# Altium PCB ESP32_EC.PcbDoc (part 1 of 2)
Units mil, origin at the board's own origin, x right, y up, seen from the top; angles counter-clockwise.
Board outline 2362.2 x 3110.24 mil, 2 copper layers (Top Layer, Bottom Layer), stack 61.756 mil thick; 57 components, 42 nets, 194 pads, 226 vias.
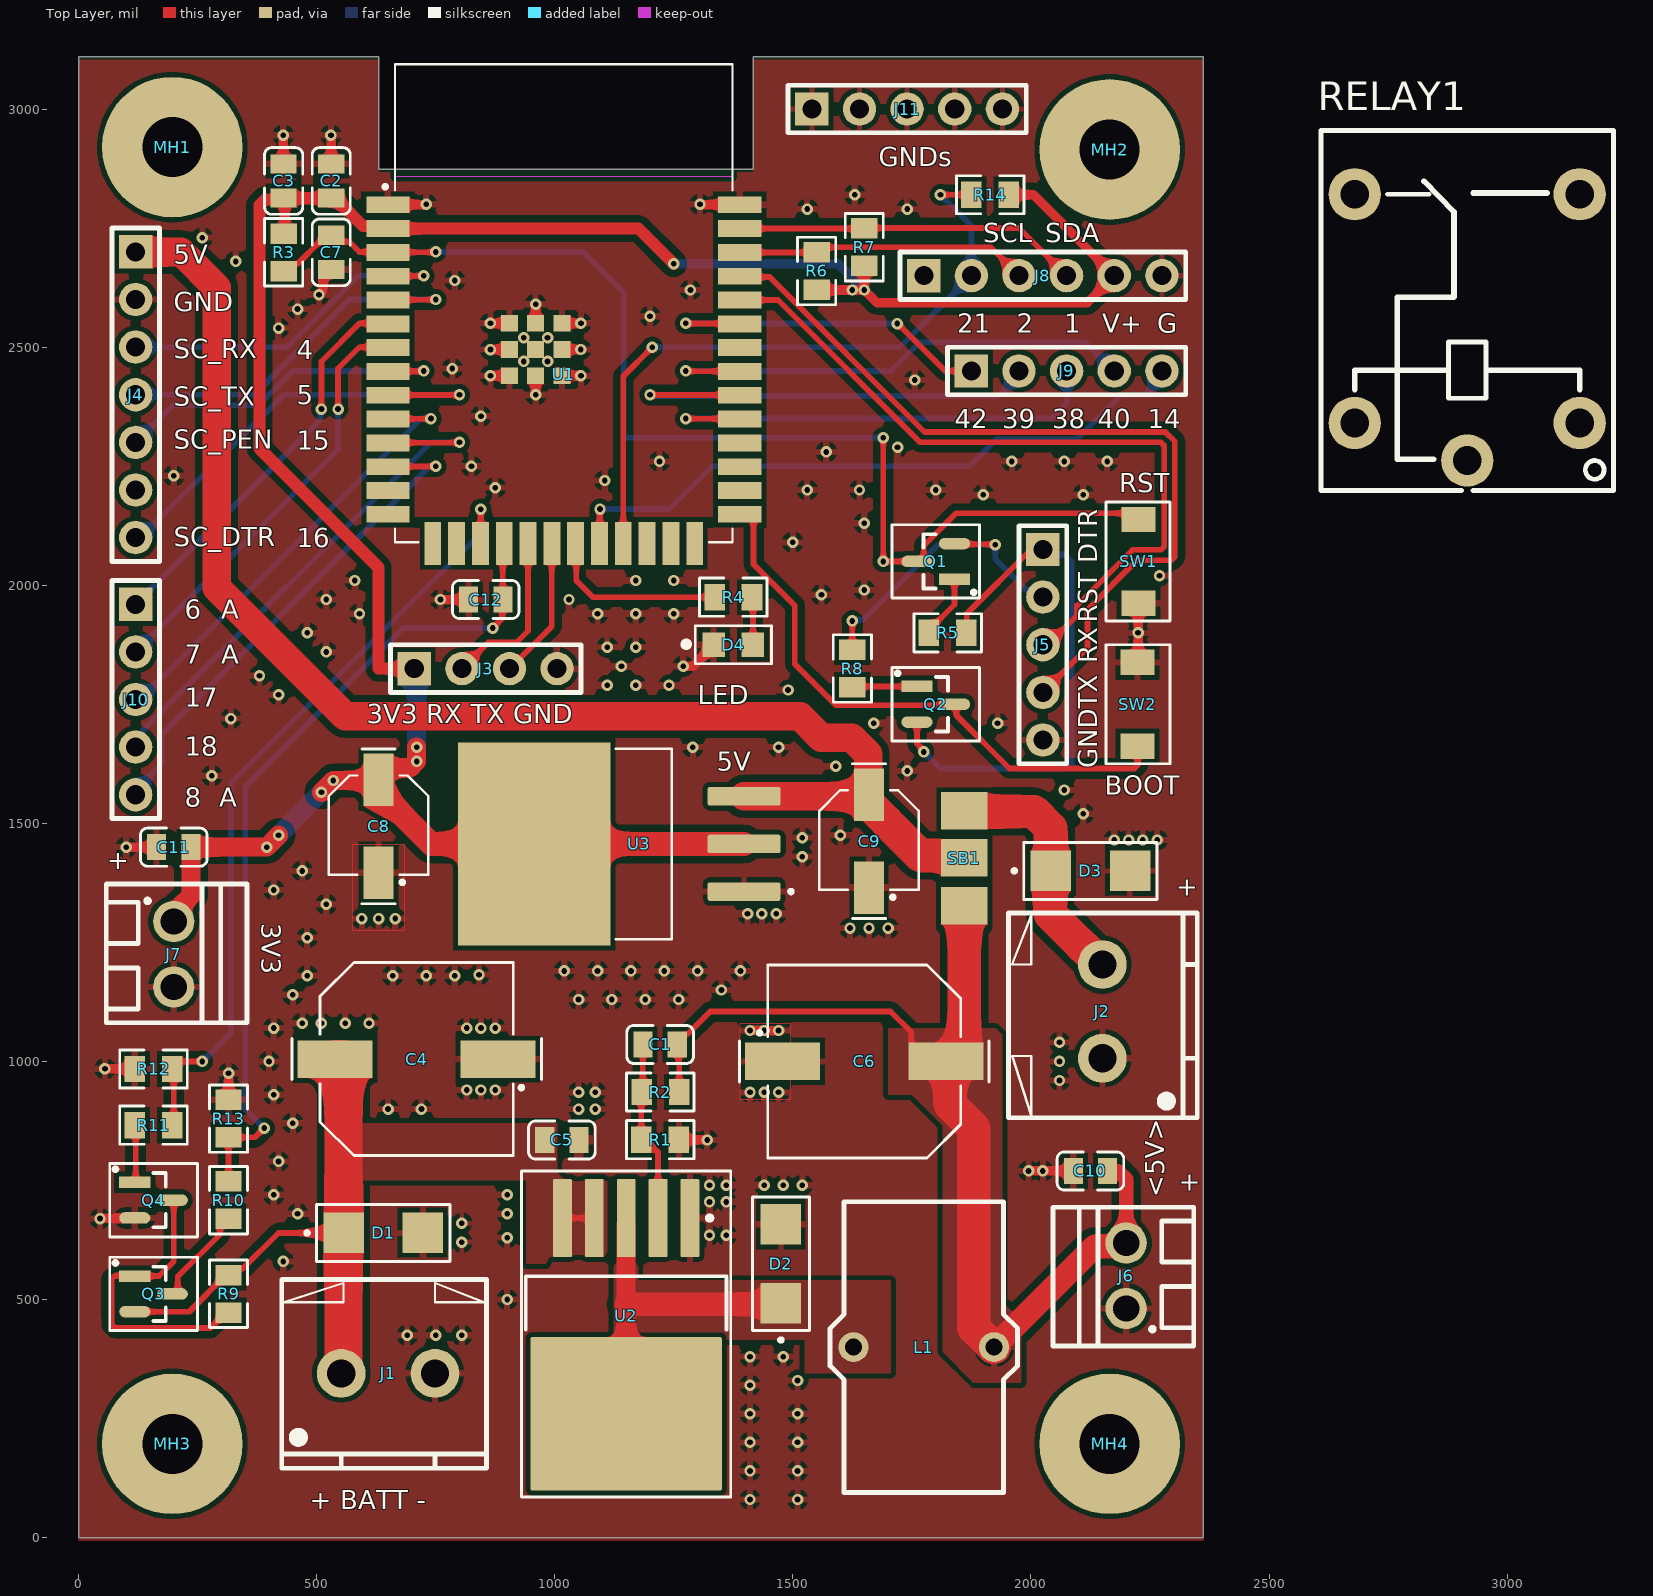
[diagram p0: Top Layer view]
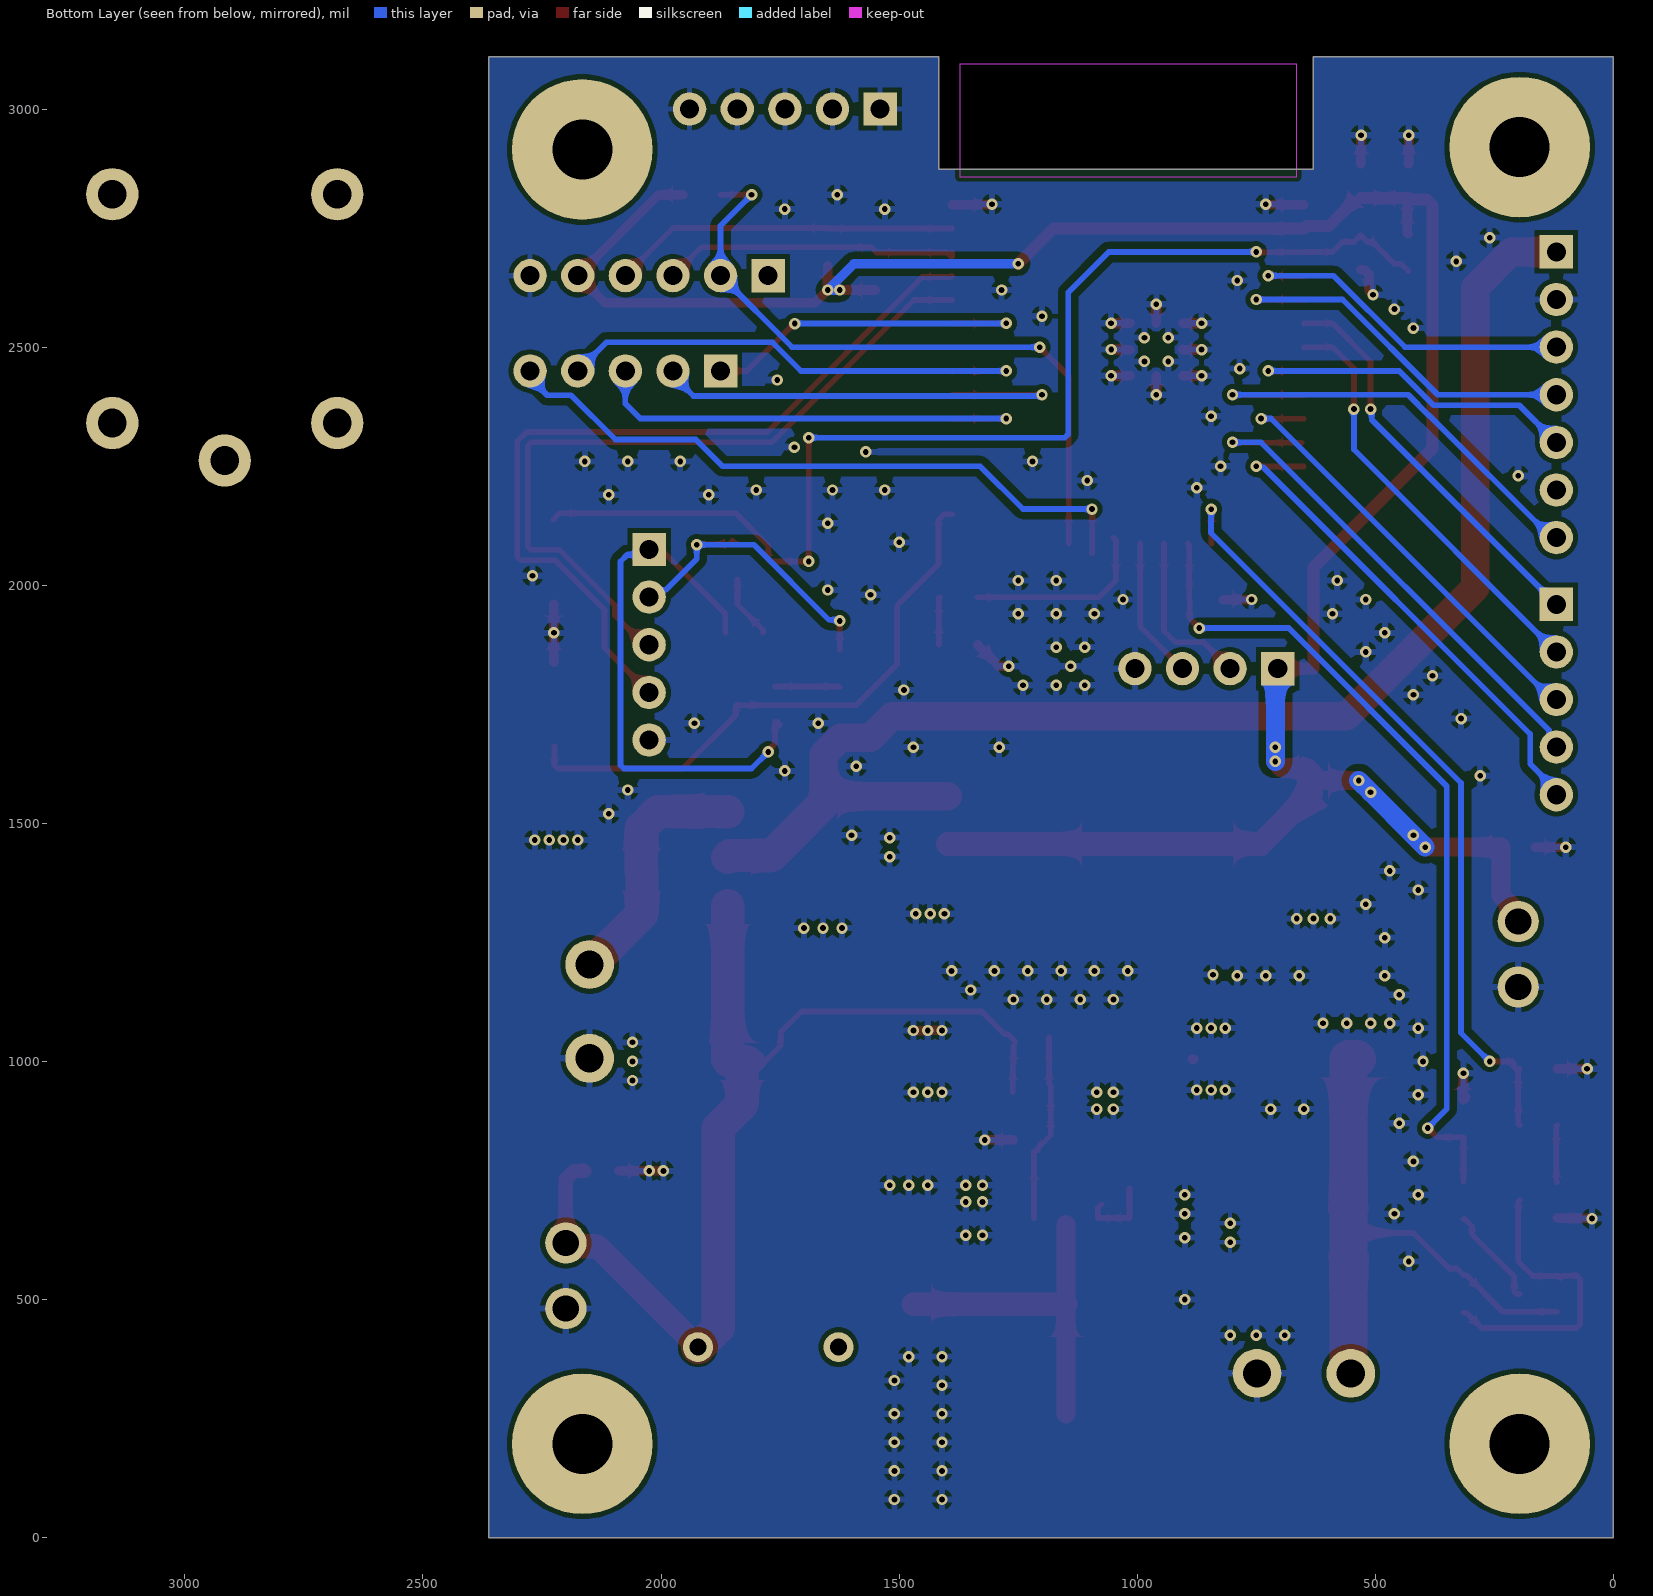
[diagram p1: Bottom Layer view, seen from below]
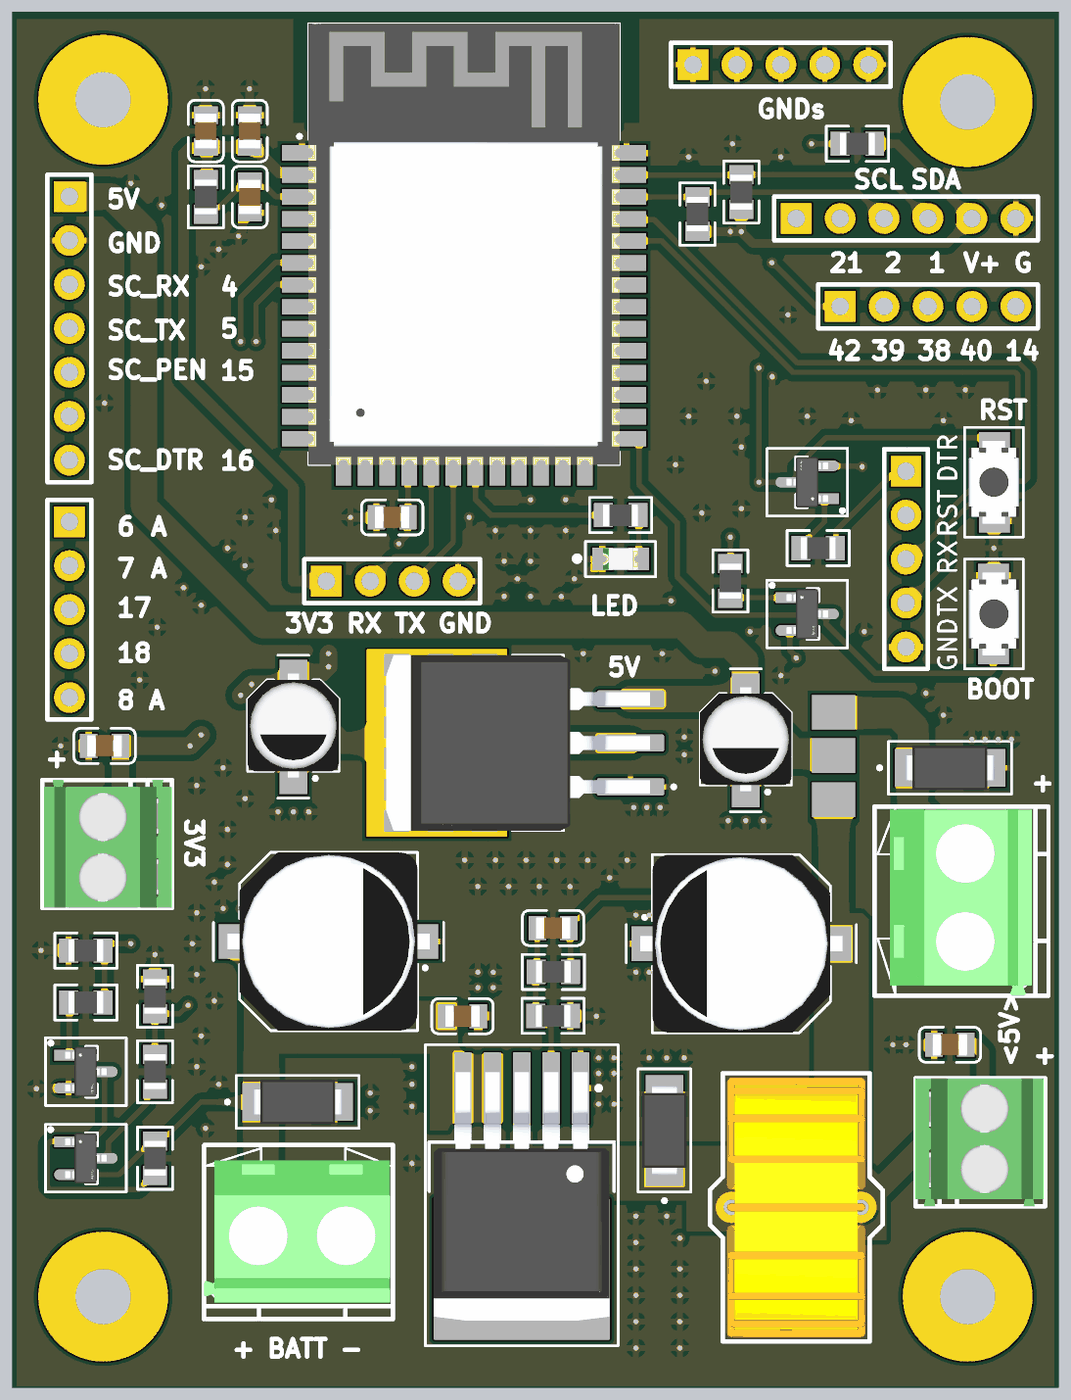
[diagram p2: 3D render of the assembled board from above, using the file's embedded part models]

## Layer stack, top to bottom
Top Solder: solder mask 1, SM-001, Dk 4
Top Layer: signal copper 1.378
Dielectric 1: core 59, Core-043, Dk 4.3
Bottom Layer: signal copper 1.378
Bottom Solder: solder mask 1, SM-001, Dk 4

## Board outline
629.92,3110.24 629.92,2874.02 1417.32,2874.02 1417.32,3110.24 2362.2,3110.24 2362.2,0 0,0 0,3110.24

## Design rules (kind name [scope] priority, off if disabled: settings)
Clearance [All] p1: gap=10 ignorepadtopadclearanceinfootprint=FALSE except(5.91: SMDPad-SMDPad; 11.81: Arc-THPad Track-THPad; 15: Arc-Fill Arc-Poly Arc-Region Track-Fill Track-Poly Track-Region; 17.72: THPad-THPad)
ComponentClearance SB1SB2 [InComponent('SB1') vs InComponent('SB2')] p1: gap=0 collisioncheckmode=3 verticalgap=0 showdistances=FALSE
ComponentClearance [All] p2: gap=10 collisioncheckmode=3 verticalgap=10 showdistances=FALSE
HoleSize [All] p1: absolutevalues=TRUE maxlimit=248.03 minlimit=1 maxpercent=80.000 minpercent=20.000
MinimumSolderMaskSliver [All] p1: minsoldermaskwidth=3.94
PolygonConnect [All] p1: connectstyle=Relief reliefconductorwidth=14 reliefentries=4 polygonreliefangle="90 Angle" airgapwidth=10
RoutingVias [All] p1: holewidth=12 width=24 viastyle="Through Hole" minholewidth=12 minwidth=24 maxholewidth=20 maxwidth=40
SilkToSilkClearance [All] p1: silktosilkclearance=5.91
SilkToSolderMaskClearance [IsPad] p1: minsilkscreentomaskgap=6 clearancetoexposedcopper=TRUE
SolderMaskExpansion [All] p1: expansion=4 istentingtop=FALSE
SupplyNets "Schematic Supply Nets" [InNet('Vbat (8.4V max)')] p1: voltage=0.000
SupplyNets "Schematic Supply Nets_6" [InNet('5V_EXT')] p2: voltage=0.000
SupplyNets "Schematic Supply Nets_5" [InNet('5V_BUCK')] p3: voltage=0.000
SupplyNets "Schematic Supply Nets_2" [InNet('5V_IN')] p4: voltage=0.000
SupplyNets "Schematic Supply Nets_1" [InNet('3V3')] p5: voltage=0.000
SupplyNets "Schematic Supply Nets_3" [InNet('GND')] p6: voltage=0.000
Width Width_1 [All] p1: maxlimit=120 minlimit=12 preferedwidth=12 minimp=50.000000 maximp=50.000000 favimp=50.000000
25 further rules are at their usual default settings.

## Components (designator, comment, footprint, x,y, rotation, side; value= is the part's Value field where it differs from the comment)
C1 "33nF 0805" CERAMIC_CAP_0805_2012_METRIC 1221.26,1035.63 r180 top value=33nF
C2 "100nF, 50V" CERAMIC_CAP_0805_2012_METRIC 530.69,2848.94 r270 top value=100nF
C3 "10uF, 25V" CAPC2012X140N 430.69,2848.94 r90 top value=10uF
C4 "330uF 35V" AEC_CAP_D10xL10P2 710,1005 r180 top
C5 "1uF, 25V" CERAMIC_CAP_0805_2012_METRIC 1015,835 r180 top value=1uF
C6 "330uF 35V" AEC_CAP_D10xL10P2 1650,1000 r0 top
C7 "1uF, 25V" CERAMIC_CAP_0805_2012_METRIC 530.69,2698.94 r90 top
C8 "47UF 16V" AEC_CAP_D5XL6P10 629.92,1496.06 r270 top value=47µF
C9 "10UF 50V SMD" AEC_CAP_D5XL6P10 1660,1465 r270 top locked value=10uF
C10 "10uF, 25V" CAPC2012X140N 2125,770 r180 top value=10uF
C11 "10uF, 25V" CAPC2012X140N 200,1450 r180 top value=10uF
C12 "100nF, 50V" CERAMIC_CAP_0805_2012_METRIC 855,1970 r0 top value=100nF
D1 "SMAJ12A" "DO-214AC, SMA" 639.76,639.76 r180 top
D2 "SS54" "DO-214AC, SMA" 1475,575 r270 top
D3 "SMAJ5A" "DO-214AC, SMA" 2125,1400 r180 top
D4 "LED GREEN CLEAR 0805 SMD" "LED 0805" 1375,1875 r180 top
J1 "Screw Terminal Blocks" "TERMINAL BLOCK 2P5.0MM" 650,345 r0 top
J2 "Screw Terminal Blocks" "TERMINAL BLOCK 2P5.0MM" 2150,1105 r90 top
J3 "4 x 2.54mm holes" "4 X 2.54MM HOLES" 855,1824.78 r90 top
J4 "7 x 2.54mm holes" "7 x 2.54mm holes" 120,2700 r0 top
J5 "5 x 2.54mm holes" "5 X 2.54MM HOLES" 2025,1875 r0 top
J6 "Terminal Block 2P_3.5MM" "TERMINAL BLOCK 2P3.5MM" 2200,550 r90 top
J7 "Terminal Block 2P_3.5MM" "TERMINAL BLOCK 2P3.5MM" 200,1225 r270 top
J8 "6 x 2.54mm holes" "6 X 2.54MM HOLES" 2025,2650 r90 top locked
J9 "5 x 2.54mm holes" "5 X 2.54MM HOLES" 2075,2450 r90 top
J10 "5 x 2.54mm holes" "5 X 2.54MM HOLES" 120,1760 r0 top
J11 "5 x 2.54mm holes" "5 x 2.54mm holes" 1740,3000 r90 top
L1 "47uH 6A" "15x8mm Toroidal Inductor" 1775,400 r0 top
MH1 "MH_5mm x 2.2mm M2" MH_7P5MMX3P2MM 196.85,2920 r0 top
MH2 "MH_5mm x 2.2mm M2" MH_7P5MMX3P2MM 2165.35,2915 r0 top
MH3 "MH_5mm x 2.2mm M2" MH_7P5MMX3P2MM 196.85,196.85 r0 top
MH4 "MH_5mm x 2.2mm M2" MH_7P5MMX3P2MM 2165.35,196.85 r0 top
Q1 "TRANS NPN 25V 1.5A SOT23-3" FP-SS8050-G-IPC_A 1800,2050 r180 top value=2kΩ
Q2 "TRANS NPN 25V 1.5A SOT23-3" FP-SS8050-G-IPC_A 1800,1750 r0 top value=2kΩ
Q3 "P-MOS IRLML6402" FP-SS8050-G-IPC_A 157.48,511.81 r0 top value=65mΩ
Q4 "N-MOS LN2302LT1G" FP-SS8050-G-IPC_A 157.48,708.66 r0 top
R1 "2K 0805" 0805_RES_1/8W 1221.26,835.63 r180 top
R2 "10.5K 0805" 0805_RES_1/8W 1221.89,935.63 r0 top value=10.5kΩ
R3 "10K 1/8 0805" 0805_RES_1/8W 430.69,2698.94 r90 top value=10kR
R4 "1K" 0805_RES_1/8W 1375,1975 r180 top value=1kR
R5 "10K 1/8 0805" 0805_RES_1/8W 1825,1900 r180 top value=10kR
R6 "4.7K OHM 1% 1/8W 0805" 0805_RES_1/8W 1550,2660 r270 top value=4.7kΩ
R7 "4.7K OHM 1% 1/8W 0805" 0805_RES_1/8W 1650,2710 r270 top value=4.7kΩ
R8 "10K 1/8 0805" 0805_RES_1/8W 1625,1825 r270 top value=10kR
R9 "100K 1/8W 0805" 0805_RES_1/8W 314.96,511.81 r90 top value=100kΩ
R10 "100K 1/8W 0805" 0805_RES_1/8W 314.96,708.66 r90 top value=100kΩ
R11 "1K" 0805_RES_1/8W 157.48,866.14 r180 top value=1kR
R12 "100K 1/8W 0805" 0805_RES_1/8W 157.48,984.25 r0 top value=100kΩ
R13 "47K 0805" 0805_RES_1/8W 314.96,880 r270 top value=47kΩ
R14 "4.7K OHM 1% 1/8W 0805" 0805_RES_1/8W 1914.37,2820 r0 top value=4.7kΩ
RELAY1 "SRD-12VDC-SL-C" RELAY-TH_SRD-XXVDC-XL-C 2916.2,2541.47 r90 top
SB1 "3 Terminals Solder Bridge" "3 Terminals Solder Bridge 4A (Open)" 1860,1426.97 r270 top
SW1 "3x4 2pins SMD" SMD_TACTILEBUT_3X4X2P5MM 2225,2050 r90 top
SW2 "3x4 2pins SMD" SMD_TACTILEBUT_3X4X2P5MM 2225,1750 r270 top
U1 "ESP32-S3-WROOM1" ESP32-S3-WROOM-1-N16R8 1018.94,2591.85 r0 top locked
U2 "XL4005E1-5V-5A-BUCK" "TO-263-5L - DIFFERENCE 3D MODEL" 1150,425 r270 top
U3 "LM1084IS-3.3/NOPB" "TO-263 (D2PAK)" 1141.73,1456.69 r180 top

## Footprints (in the part's own frame and the unit in brackets; to place one, negate y for a bottom-side part, rotate by r counter-clockwise, add the part's x,y. Pads: shape width x height; smd on the part's side, far side on the other; paste and mask are expansions set on the pad)
"3 Terminals Solder Bridge 4A (Open)" [mm] "3 Terminals Solder Bridge 4A (Open)"
  rect 2x2.5 smd: 1(-2.53,0) 2(2.53,0) 3(-0.03,0)
"4 X 2.54MM HOLES" [mil] "4 x 2.54mm holes"
  rect 70x70 hole 40: 1(0,150)
  round 70 hole 40: 2(0,50) 3(0,-50) 4(0,-150)
  silkscreen extent -50,-200 50,200
"5 X 2.54MM HOLES" [mil] "5 x 2.54mm holes"
  rect 70x70 hole 40: 1(0,200)
  round 70 hole 40: 2(0,100) 3(0,0) 4(0,-100) 5(0,-200)
  silkscreen extent -50,-250 50,250
"5 x 2.54mm holes" [mil] "5 x 2.54mm holes"
  rect 70x70 hole 40: 1(0,200)
  round 70 hole 40: 2(0,100) 3(0,0) 4(0,-100) 5(0,-200)
  silkscreen extent -50,-250 50,250
"6 X 2.54MM HOLES" [mil] "6 x 2.54mm holes"
  rect 70x70 hole 40: 1(0,250)
  round 70 hole 40: 2(0,150) 3(0,50) 4(0,-50) 5(0,-150) 6(0,-250)
  silkscreen extent -50,-300 50,300
"7 x 2.54mm holes" [mil] "7 x 2.54mm holes"
  rect 70x70 hole 40: 1(0,0)
  round 70 hole 40: 2(0,-100) 3(0,-200) 4(0,-300) 5(0,-400) 6(0,-500) 7(0,-600)
  silkscreen extent -50,-650 50,50
"15x8mm Toroidal Inductor" [mm] "Outer Diameter 15mm Width 8mm"
  round 1.6 hole 0.9: 1(-3.75,0) 2(3.75,0)
  silkscreen extent -5,-7.75 5,7.75, body extent -4,-7.5 4,7.5, height 15.5
0805_RES_1/8W [mm]
  rect 1.1x1.4 smd: 1(-1,0) 2(1,0)
  silkscreen extent -1.8,-1.02 1.8,1.02, body extent -1,-0.63 1,0.63, height 0.6
AEC_CAP_D5XL6P10 [mm] "D5xL6P10_10uF_35V"
  rect 2.8x1.6 smd: 1(-2.413,0) 2(2.54,0)
  silkscreen extent -4.06,-2.65 4.19,2.65, body extent -3,-2.65 3,2.65, height 5.8
AEC_CAP_D10xL10P2 [mm] "D10xL10P2"
  rect 4x2 smd: 1(4.35,0) 2(-4.35,0)
  silkscreen extent -6.65,-5.15 6.65,5.15, body extent -5.85,-5.15 5.85,5.15, height 10.2
CAPC2012X140N [mil] "2012 Metric_0805 Imperial"
  rect 40x55 smd: 1(-36,0) 2(36,0)
  silkscreen extent -70,-40 70,40, body extent -39,-25 39,25, height 53
CERAMIC_CAP_0805_2012_METRIC [mil] "2012 Metric_0805 Imperial"
  rect 40x55 smd: 1(-36,0) 2(36,0)
  silkscreen extent -70,-40 70,40, body extent -39,-25 39,25, height 53
"DO-214AC, SMA" [mil] "DO-214AA (aka SMB) is Middle Size. DO-214AB (aka SMC) is the Largest Size. DO-214AC (aka SMA) is the Smallest Size."
  rect 85x85 smd: 1(-83.27,0) 2(83.27,0)
  silkscreen extent -140,-60 164,60, body extent -101,-50 101,50, height 99
ESP32-S3-WROOM-1-N16R8 [mm]
  rect 2.3x0.9 smd: 2(-9.385,3.99) 3(-9.385,2.72) 4(-9.385,1.45) 5(-9.385,0.18) 6(-9.385,-1.09) 7(-9.385,-2.36) 8(-9.385,-3.63) 9(-9.385,-4.9) 10(-9.385,-6.17) 11(-9.385,-7.44) 12(-9.385,-8.71) 13(-9.385,-9.98) 14(-9.385,-11.25) 27(9.385,-11.25) 28(9.385,-9.98) 29(9.385,-8.71) 30(9.385,-7.44) 31(9.385,-6.17) 32(9.385,-4.9) 33(9.385,-3.63) 34(9.385,-2.36) 35(9.385,-1.09) 36(9.385,0.18) 37(9.385,1.45) 38(9.385,2.72) 39(9.385,3.99) GND(-9.385,5.26) GND(9.385,5.26)
  rect 0.9x2.3 smd: 15(-6.985,-12.804) 16(-5.715,-12.804) 17(-4.445,-12.804) 18(-3.175,-12.804) 19(-1.905,-12.804) 20(-0.635,-12.804) 21(0.635,-12.804) 22(1.905,-12.804) 23(3.175,-12.804) 24(4.445,-12.804) 25(5.715,-12.804) 26(6.985,-12.804)
  rect 0.9x0.9 smd: GND(-2.9,-3.86) GND(-2.9,-2.46) GND(-2.9,-1.06) GND(-1.5,-3.86) GND(-1.5,-2.46) GND(-1.5,-1.06) GND(-0.1,-3.86) GND(-0.1,-2.46) GND(-0.1,-1.06)
  Keep-Out Layer region: 9,6.75 -9,6.75 -9,12.75 9,12.75
  Keep-Out Layer region: 9,6.75 -9,6.75 -9,12.75 9,12.75
  silkscreen extent -9.62,-12.75 9,12.75, body extent -9,-12.75 9,12.75, height 3.25
FP-SS8050-G-IPC_A [mm]
  rect 1.657x0.612 smd paste+0: 1(-1.001,0.95)
  rrect100% 1.657x0.612 smd paste+0: 2(-1.001,-0.95)
  rrect100% 1.657x0.612 smd paste+0 mask-0.05: 3(1.001,0)
  silkscreen extent -2.34,-1.96 2.34,1.96, body extent -2.33,-1.95 2.33,1.95, height 0.25
"LED 0805" [mm]
  rect 1.2x1.3 smd: 1(-1.05,0) 2(1.05,0)
  silkscreen extent -2.03,-1.02 2.57,1.02, body extent -1,-0.63 1,0.63, height 0.7
MH_7P5MMX3P2MM [mm] "7.5mm x 3.2mm Mounting Hole"
  round 7.5 hole 3.2: 1(0,0)
RELAY-TH_SRD-XXVDC-XL-C [mil] "Power Relay 1 Form C: 1C (SPDT-CO) 12V Coil Through Hole,15.6x19.2mm"
  round 110 hole 60: 1(-200.79,-236.22) 2(279.53,-236.2) 3(279.53,236.2) 4(-200.79,236.22) 5(-279.53,0)
  silkscreen extent -344,-308 413,307, body extent -345,-316 411,306, height 623
SMD_TACTILEBUT_3X4X2P5MM [mil] "3X4X2P5MM_SMD_TACTILE_BUTTON"
  rect 53.15x70.87 smd: 1(-88,-1) 2(88,-1)
  silkscreen extent -125,-67 125,67, body extent -94,-57 94,57, height 79
"TERMINAL BLOCK 2P3.5MM" [mm]
  round 2.2 hole 1.4 mask+0.051: 1(-1.75,0) 2(1.75,0)
  silkscreen extent -3.75,-3.6 3.65,3.9, body extent -3.75,-3.5 3.65,3.9, height 8.55
"TERMINAL BLOCK 2P5.0MM" [mm] "1x2P 24A -40â„ƒ~+105â„ƒ 250V Green 12~22 Direct Insert 5mm 2.5 1 2 Plugin,P=5mm Screw Terminal Blocks ROHS"
  round 2.6 hole 1.5: 1(-2.5,0) 2(2.5,0)
  silkscreen extent -5.68,-5.06 5.25,5, body extent -5.68,-4.1 5.08,4.1, height 10.01
"TO-263 (D2PAK)" [mm] "TO-263 (DDPAK)"
  rrect25% 3.9x0.99 smd: 1(-6.5,2.54) 2(-6.5,0) 3(-6.5,-2.54)
  rect 8.128x10.84 smd paste-6: 4(4.699,0)
  silkscreen extent -9.1,-5.08 0.35,5.08, body extent -7.62,-5.08 7.62,5.08, height 4.83
"TO-263-5L - DIFFERENCE 3D MODEL" [mm] "TO-263-5L (DDPAK, 5-Leads) Body 10.65x9.65mm, Pitch 1.7mm, IPC Medium Density"
  rrect10% 4.15x1 smd: 1(-6.25,3.4) 2(-6.25,1.7) 3(-6.25,0) 4(-6.25,-1.7) 5(-6.25,-3.4)
  rrect2% 8.2x10.2 smd: 6(4.191,0)
  silkscreen extent -8.76,-5.58 8.64,5.58, body extent -7.17,-5.08 7.17,5.08, height 4.71

## Part data
C1: library part C0805C333F3GEC7210, "CAP CER 0805 33nF 1%", Dielectric Material=Ceramic, Manufacturer=KEMET, Max Operating Temperature=125°C, Min Operating Temperature=-55°C, Supplier Part Number=399-C0805C333F3GEC7210CT-ND, Voltage Rating (DC)=25V, Category="Ceramic Capacitors", ComponentLink1Description=https://datasheet.octopart.com:443/C0805C333F3GEC7210-KEMET-datasheet-176292478.pdf?src-supplier=IHS, ComponentLink1URL=https://datasheet.octopart.com:443/C0805C333F3GEC7210-KEMET-datasheet-176292478.pdf?src-supplier=IHS, Height=1.25mm, Length=2mm, Lifecycle Status=Production, Manufacturer Part Number=C0805C333F3GEC7210, Mounting Technology="Surface Mount", Number of Terminals=2, Pricing="1=1.4, 10=0.879, 50=0.7314, 100=0.6728, 500=0.5736, 1000=0.54292, 2500=0.51378 (USD)", REACH SVHC=Yes, RoHS=Compliant, Stock=4179, Supplier=DigiKey, Width=1.25mm
C2 C12: library part CL21B104KBCNNNC, "50V 100nF X7R ±10% 0805 Multilayer Ceramic Capacitors MLCC - SMD/SMT ROHS", Capacitor Type=Ceramic, Case/Package=0805, LCSC Part Number=C1711, Manufacturer=Samsung, Max Operating Temperature=125°C, Min Operating Temperature=-55°C, Package Shape=Rectangular, Package Style=SMTMeter, Rated DC Voltage (URdc)=50V, Supplier Part Number=1276-1003-6-ND, Temperature Characteristics Code=X7R, Tolerance  (fill in as +-)=10%, Category="Ceramic Capacitors", Dielectric Material=Ceramic, Height=0.95mm, JESD-609 Code=e3, Length=2mm, Manufacturer Part Number=CL21B104KBCNNNC, Mounting Technology="Surface Mount", Multilayer=Yes, Packaging="Tape and Reel", Pins=2, Pricing="1=0.1, 10=0.035, 50=0.0238, 100=0.0203, 500=0.01446, 1000=0.01266 (USD)", Reach SVHC Compliant=Yes, RoHS=Yes, RoHS Compliant=Yes, Stock=2034358, Supplier=Digikey, Terminal Finish=Nickel, Termination=Wraparound, Tolerance (fill in as +-)=10%, Width=1.25mm
C3 C10 C11: library part CL21B106KAYQNNE, "25V 10uF X7R ±10% 0805 Multilayer Ceramic Capacitors MLCC - SMD/SMT ROHS", Capacitor Type=Ceramic, Case/Package=0805, LCSC Part Number=C3039694, Manufacturer=Samsung, Max Operating Temperature=125°C, Min Operating Temperature=-55°C, Package Shape=Rectangular, Rated DC Voltage (URdc)=25V, Supplier Part Number=1276-CL21B106KAYQNNECT-ND, Temperature Characteristics Code=X7R, Tolerance  (fill in as +-)=10%, Category="Ceramic Capacitors", ComponentLink1Description=https://datasheet.ciiva.com:443/pdfs/VipMasterIC/IC/SEMS/SEMS-S-A0005593215/SEMS-S-A0005590463-1.pdf?src-supplier=IHS+Markit, ComponentLink1URL=https://datasheet.ciiva.com:443/pdfs/VipMasterIC/IC/SEMS/SEMS-S-A0005593215/SEMS-S-A0005590463-1.pdf?src-supplier=IHS+Markit, Dielectric Material=Ceramic, Manufacturer Part Number=CL21B106KAYQNNE, Mounting Technology="Surface Mount", Multilayer=Yes, Packaging="Tape and Reel", Pins=2, Pricing="1=0.35, 10=0.206, 50=0.1484, 100=0.1304, 500=0.09992, 1000=0.09042 (USD)", Reach SVHC Compliant=Yes, RoHS=Yes, RoHS Compliant=No, Supplier=Digikey, Termination=Wraparound, Tolerance (fill in as +-)=10%
C4 C6: library part EEH-ZS1V331P, "330uF 35V ±30% SMD,D10xL10.2mm Aluminum Electrolytic Capacitors - SMD ROHS", LCSC Number Part=C2895745, Manufacturer=Panasonic, Supplier Part Number=10-EEH-ZS1V331PCT-ND, Category="Polymer Capacitors", Manufacturer Part Number=EEH-ZS1V331P, Pricing="1=2.29, 10=1.477, 50=1.1476, 100=1.045 (USD)", RoHS=Yes, Stock=2119, Supplier=Digikey
C5: library part CL21B105KAFNNNE, "25V 1uF X7R ±10% 0805 Multilayer Ceramic Capacitors MLCC - SMD/SMT ROHS", Capacitor Type=Ceramic, Case/Package=0805, LCSC Part Number=C116352, Manufacturer=Samsung, Max Operating Temperature=125°C, Min Operating Temperature=-55°C, Package Shape=Rectangular, Package Style=SMTMeter, Rated DC Voltage (URdc)=25V, Supplier Part Number=1276-1066-1-ND, Temperature Characteristics Code=X7R, Tolerance  (fill in as +-)=10%, Category="Ceramic Capacitors", ComponentLink1Description=https://datasheet.ciiva.com:443/pdfs/VipMasterIC/IC/SEMS/SEMS-S-A0008523501/SEMS-S-A0008523563-1.pdf?src-supplier=IHS+Markit, ComponentLink1URL=https://datasheet.ciiva.com:443/pdfs/VipMasterIC/IC/SEMS/SEMS-S-A0008523501/SEMS-S-A0008523563-1.pdf?src-supplier=IHS+Markit, ComponentLink2Description=https://datasheet.ciiva.com/25800/cl21b105kafnnne-25800163.pdf?src-supplier=Digikey, ComponentLink2URL=https://datasheet.ciiva.com/25800/cl21b105kafnnne-25800163.pdf?src-supplier=Digikey, ComponentLink3Description=https://datasheet.ciiva.com/15195/getdatasheetpartid-355205-15195880.pdf?src-supplier=Verical, ComponentLink3URL=https://datasheet.ciiva.com/15195/getdatasheetpartid-355205-15195880.pdf?src-supplier=Verical, Dielectric Material=Ceramic, Height=1.35mm, JESD-609 Code=e3, Length=2mm, Manufacturer Part Number=CL21B105KAFNNNE, Mounting Technology="Surface Mount", Multilayer=Yes, Packaging="Tape and Reel", Pins=2, Pricing="1=0.1, 10=0.046, 50=0.0318, 100=0.0273, 500=0.01968, 1000=0.01731, 2000=0.01536, 4000=0.01375, 6000=0.01294, 10000=0.01204, 14000=0.01151, 20000=0.011, 50000=0.0099, 100000=0.00923, 200000=0.00868 (USD)", Reach SVHC Compliant=Yes, RoHS=Yes, RoHS Compliant=Yes, Stock=1189368, Supplier=Digikey, Terminal Finish=Nickel, Termination=Wraparound, Tolerance (fill in as +-)=10%, Width=1.25mm
C7: library part 3372-0805B105J250CCTR-ND, "1uF ±10% 50V Ceramic Capacitor X7R 0805", LCSC Part Number=C215803
C8: library part 16SVPG47M, "CAP ALUM POLY 47UF 20% 16V SMD D5.00", Case/Package=Radial, ESR (Equivalent Series Resistance)=25mΩ, Leakage Current=150µA, Manufacturer=Panasonic, Manufacturer Lifecycle Status=ACTIVE, Max Operating Temperature=105°C, Min Operating Temperature=-55°C, Ripple Current=160mA, Supplier Part Number=P18930CT-ND, Tolerance=20%, Voltage Rating=16V, Category="Aluminum Electrolytic Capacitors", ComponentLink1Description=https://datasheet.octopart.com:443/16SVPG47M-Panasonic-datasheet-182100668.pdf?src-supplier=IHS, ComponentLink1URL=https://datasheet.octopart.com:443/16SVPG47M-Panasonic-datasheet-182100668.pdf?src-supplier=IHS, ComponentLink2Description=https://datasheet.octopart.com:443/16SVPG47M-Panasonic-datasheet-62065354.pdf?src-supplier=Panasonic, ComponentLink2URL=https://datasheet.octopart.com:443/16SVPG47M-Panasonic-datasheet-62065354.pdf?src-supplier=Panasonic, ComponentLink3Description=https://sigma.octopart.com:443/138897373/technical_drawing/Panasonic-16SVPG47M.pdf?src-supplier=Upverter, ComponentLink3URL=https://sigma.octopart.com:443/138897373/technical_drawing/Panasonic-16SVPG47M.pdf?src-supplier=Upverter, ComponentLink4Description=https://datasheet.octopart.com:443/16SVPG47M-Panasonic-datasheet-102492111.pdf?src-supplier=Farnell, ComponentLink4URL=https://datasheet.octopart.com:443/16SVPG47M-Panasonic-datasheet-102492111.pdf?src-supplier=Farnell, ComponentLink5Description=https://datasheet.octopart.com:443/16SVPG47M-Panasonic-datasheet-38538411.pdf?src-supplier=Newark, ComponentLink5URL=https://datasheet.octopart.com:443/16SVPG47M-Panasonic-datasheet-38538411.pdf?src-supplier=Newark, ComponentLink6Description=https://datasheet.octopart.com:443/16SVPG47M-Panasonic-datasheet-151609408.pdf?src-supplier=Master+Electronics, ComponentLink6URL=https://datasheet.octopart.com:443/16SVPG47M-Panasonic-datasheet-151609408.pdf?src-supplier=Master+Electronics, ComponentLink7Description=https://sigma.octopart.com:443/150570690/technical_drawing/Panasonic-16SVPG47M.pdf?src-supplier=Panasonic+SCT, ComponentLink7URL=https://sigma.octopart.com:443/150570690/technical_drawing/Panasonic-16SVPG47M.pdf?src-supplier=Panasonic+SCT, ComponentLink8Description=https://datasheet.octopart.com:443/16SVPG47M-Panasonic-datasheet-138704366.pdf?src-supplier=TME, ComponentLink8URL=https://datasheet.octopart.com:443/16SVPG47M-Panasonic-datasheet-138704366.pdf?src-supplier=TME, Diameter=5mm, Dissipation Factor=12%, Height=4.4mm, Height - Seated (Max)=4.4958mm, Length=5.3mm, Life (Hours)=5000hours, Lifecycle Status=Production, Manufacturer Part Number=16SVPG47M, Material=Polymer, Mounting Technology="Surface Mount", Number of Terminals=2, Part Series=SVPG, Polarity=Polar, Pricing="1=1.43, 10=0.92, 50=0.7086, 100=0.6416, 500=0.52624, 1000=0.48992 (USD)", REACH SVHC=Yes, RoHS=Compliant, Schedule B="8532220020, 8532220020|8532220020, 8532220020|8532220020|8532220020, 8532220020|8532220020|8532220020|8532220020", Stock=12369, Supplier=DigiKey, Voltage Rating (DC)=16V, Width=5.3mm
C9: library part EEH-ZA1H100R, "CAP ALUM HYBRID 10UF 20% 50V SMD (D5L6P10)", Capacitor Type=Aluminium, Case/Package=2121, ESR (Equivalent Series Resistance)=120mR, Leakage Current=5uA, Manufacturer=Panasonic, Max Operating Temperature=105°C, Min Operating Temperature=-55°C, Package Style=SMTMeter, Rated DC Voltage (URdc)=50V, Ripple Current=75mA, Supplier Part Number=10-EEH-ZA1H100RCT-ND, Tolerance  (fill in as +-)=20%, Category="Polymer Capacitors", ComponentLink1Description=https://datasheet.ciiva.com:443/pdfs/VipMasterIC/IC/PANA/PANA-S-A0009553130/PANA-S-A0009553130-1.pdf?src-supplier=IHS+Markit, ComponentLink1URL=https://datasheet.ciiva.com:443/pdfs/VipMasterIC/IC/PANA/PANA-S-A0009553130/PANA-S-A0009553130-1.pdf?src-supplier=IHS+Markit, ComponentLink2Description=https://datasheet.ciiva.com/25613/0900766b81233638-25613634.pdf?src-supplier=Rs, ComponentLink2URL=https://datasheet.ciiva.com/25613/0900766b81233638-25613634.pdf?src-supplier=Rs, ComponentLink3Description=https://datasheet.ciiva.com/22730/1536543-22730556.pdf?src-supplier=Element14, ComponentLink3URL=https://datasheet.ciiva.com/22730/1536543-22730556.pdf?src-supplier=Element14, ComponentLink4Description=https://datasheet.ciiva.com/28691/1536543-28691417.pdf?src-supplier=Element14, ComponentLink4URL=https://datasheet.ciiva.com/28691/1536543-28691417.pdf?src-supplier=Element14, ComponentLink5Description=https://datasheet.ciiva.com/7794/1536543-7794234.pdf?src-supplier=Element14, ComponentLink5URL=https://datasheet.ciiva.com/7794/1536543-7794234.pdf?src-supplier=Element14, ComponentLink6Description=https://datasheet.ciiva.com/6121/1536543-6121368.pdf?src-supplier=Farnell, ComponentLink6URL=https://datasheet.ciiva.com/6121/1536543-6121368.pdf?src-supplier=Farnell, ComponentLink7Description=https://datasheet.ciiva.com/11679/aba0000ce136-11679434.pdf?src-supplier=Avnet, ComponentLink7URL=https://datasheet.ciiva.com/11679/aba0000ce136-11679434.pdf?src-supplier=Avnet, ComponentLink8Description=https://datasheet.ciiva.com/6327/aba0000ce136-6327913.pdf?src-supplier=Digikey, ComponentLink8URL=https://datasheet.ciiva.com/6327/aba0000ce136-6327913.pdf?src-supplier=Digikey, ComponentLink9Description=https://datasheet.ciiva.com/6327/aba0000ce136-6327914.pdf?src-supplier=Digikey, ComponentLink9URL=https://datasheet.ciiva.com/6327/aba0000ce136-6327914.pdf?src-supplier=Digikey, ComponentLink10Description=https://datasheet.ciiva.com/6327/aba0000ce136-6327916.pdf?src-supplier=Digikey, ComponentLink10URL=https://datasheet.ciiva.com/6327/aba0000ce136-6327916.pdf?src-supplier=Digikey, ComponentLink11Description=https://datasheet.ciiva.com/10331/aba0000ce136-10331175.pdf?src-supplier=Avnet, ComponentLink11URL=https://datasheet.ciiva.com/10331/aba0000ce136-10331175.pdf?src-supplier=Avnet, Diameter=5mm, Dielectric Material=Aluminium, Length=5.8mm, Manufacturer Part Number=EEH-ZA1H100R, Mounting Technology="Surface Mount", Packaging="Tape and Reel", Pins=2, Polarity=Polarized, Pricing="1=1.36, 10=0.853, 50=0.6486, 100=0.5847, 500=0.47586 (USD)", Reach SVHC Compliant=Yes, Reference Standard=AEC-Q200, RoHS=Yes, RoHS Compliant=Yes, Stock=1272, Supplier=Digikey, Tan Delta=0.1, Termination=Flat, Tolerance (fill in as +-)=20%
D1: "TVS DIODE 12VWM 20.9VC DO214AC", LCSC Number Part=C148213, Datasheet=https://www.littelfuse.com/~/media/electronics/datasheets/tvs_diodes/littelfuse_tvs_diode_smaj_datasheet.pdf.pdf
D2: "Diode 40 V 5A Surface Mount DO-214AC (SMA)", LCSC Number Part=C22452, Datasheet=https://www.lcsc.com/datasheet/lcsc_datasheet_2209161430_SUNMATE-Elec-SS34_C5155170.pdf
D3: "43.5A 400W 9.2V 6.4V 5V SMA(DO-214AC) ESD and Surge Protection (TVS/ESD) ROHS", Breakdown Voltage-Nom=6.7V, Clamping Voltage-Max=9.2V, LSCS Part Number=C223992, Manufacturer=Littelfuse, Manufacturer Part Number=SMAJ5.0A, Max Breakdown Voltage=7V, Max Operating Temperature=150°C, Min Breakdown Voltage=6.4V, Min Operating Temperature=-65°C, Non-rep Peak Rev Power Dis-Max=50kW, Package Body Material=Plastic, Package Shape=Rectangular, Package Style="SMALL OUTLINEMeter", Peak Reflow Temperature (Cel)=260°C, Rep Pk Reverse Voltage-Max=5V, Supplier Part Number=SMAJ5.0ALFCT-ND, Time @ Peak Reflow Temperature-Max (s)=30s, Category="TVS Diodes", ComponentLink1Description=https://datasheet.ciiva.com:443/pdfs/VipMasterIC/IC/LFSI/LFSI-S-A0001360630/LFSI-S-A0001360630-1.pdf?src-supplier=IHS+Markit, ComponentLink1URL=https://datasheet.ciiva.com:443/pdfs/VipMasterIC/IC/LFSI/LFSI-S-A0001360630/LFSI-S-A0001360630-1.pdf?src-supplier=IHS+Markit, ComponentLink2Description=https://datasheet.ciiva.com/25624/0900766b810f4edb-25624839.pdf?src-supplier=Rs, ComponentLink2URL=https://datasheet.ciiva.com/25624/0900766b810f4edb-25624839.pdf?src-supplier=Rs, ComponentLink3Description=https://datasheet.ciiva.com/8062/littelfuse-tvs-diode-smaj-8062271.pdf?src-supplier=Element14, ComponentLink3URL=https://datasheet.ciiva.com/8062/littelfuse-tvs-diode-smaj-8062271.pdf?src-supplier=Element14, ComponentLink4Description=https://datasheet.ciiva.com/4507/littelfuse-tvs-diode-smaj-23503-4507964.pdf?src-supplier=Mouser, ComponentLink4URL=https://datasheet.ciiva.com/4507/littelfuse-tvs-diode-smaj-23503-4507964.pdf?src-supplier=Mouser, ComponentLink5Description=https://datasheet.ciiva.com/16380/littelfuse-tvs-diode-smaj-16380982.pdf?src-supplier=Future+Electronics, ComponentLink5URL=https://datasheet.ciiva.com/16380/littelfuse-tvs-diode-smaj-16380982.pdf?src-supplier=Future+Electronics, Diode Element Material=SILICON, Diode Type="TRANS VOLTAGE SUPPRESSOR", JEDEC-95 Code=DO-214AC, JESD-30 Code=R-PDSO-C2, JESD-609 Code=e3, Moisture Sensitivity Level=1, Number of Elements=1, Pins=2, Polarity=Unidirectional, Pricing="1=0.3, 10=0.205, 100=0.1376, 500=0.1061, 1000=0.09556, 2000=0.08656, 5000=0.07665, 10000=0.07044, 15000=0.06725, 25000=0.06365, 35000=0.06151, 50000=0.05942, 125000=0.05912 (USD)", Qualification Status="Not Qualified", Reach SVHC Compliant=No, RoHS=Yes, RoHS Compliant=Yes, Stock=63263, Supplier=Digikey, Surface Mount=Yes, Technology=AVALANCHE, Terminal Finish=Tin, Terminal Form="C BEND", Terminal Position=DUAL
D4: library part 150080VS75000, "Green 570nm LED Indication - Discrete 2V 0805 (2012 Metric)", Color=Green, Forward Current=30mA, LCSC Part Number=C84257, Manufacturer="Wurth Electronics", Max Operating Temperature=85°C, Min Operating Temperature=-40°C, Supplier Part Number=732-4986-1-ND, Category=LEDs, Channels=1, ComponentLink1Description=https://datasheet.ciiva.com:443/pdfs/VipMasterIC/IC/MIDC/MIDC-S-A0007455962/MIDC-S-A0007455962-1.pdf?src-supplier=IHS+Markit, ComponentLink1URL=https://datasheet.ciiva.com:443/pdfs/VipMasterIC/IC/MIDC/MIDC-S-A0007455962/MIDC-S-A0007455962-1.pdf?src-supplier=IHS+Markit, ComponentLink2Description=https://datasheet.ciiva.com/22656/150080vs75000-22656966.pdf?src-supplier=Element14, ComponentLink2URL=https://datasheet.ciiva.com/22656/150080vs75000-22656966.pdf?src-supplier=Element14, ComponentLink3Description=https://datasheet.ciiva.com/29279/759437-da-01-en-chipled-0805-w-kl-h-gruen-150080vs7500-29279047.pdf?src-supplier=Conrad, ComponentLink3URL=https://datasheet.ciiva.com/29279/759437-da-01-en-chipled-0805-w-kl-h-gruen-150080vs7500-29279047.pdf?src-supplier=Conrad, ComponentLink4Description=https://datasheet.ciiva.com/29563/150080vs75000-29563018.pdf?src-supplier=Digikey, ComponentLink4URL=https://datasheet.ciiva.com/29563/150080vs75000-29563018.pdf?src-supplier=Digikey, Lens Style="WATER CLEAR", Luminous Intensity-Nom=40mcd, Manufacturer Part Number=150080VS75000, Mounting Technology="Surface Mount", Optoelectronic Device Type="SINGLE COLOR LED", Overall Height=0.7mm, Packaging="Tape and Reel", Pins=2, Pricing="1=0.18, 50=0.176, 100=0.151, 500=0.131, 4000=0.131 (USD)", Reach SVHC Compliant=Yes, RoHS=Yes, RoHS Compliant=Yes, Shape=Rectangular, Size=1.4mm, Stock=33035, Supplier=Digikey, Terminal Pitch=2.1mm, Viewing Angle=140°
J1 J2: library part "Terminal Block 2P 5.0mm", "1x2P 24A -40℃~+105℃ 250V Green 12~22 Direct Insert 5mm 2.5 1 2 Plugin,P=5mm Screw Terminal Blocks ROHS", LCSC Number Part=C474950
J6 J7: library part "Terminal Block 2P 3.5MM", "1x2P 10A -40℃~+105℃ 300V Green 16~26 Direct Insert 3.5mm 1 1 2 Plugin,P=3.5mm Screw Terminal Blocks ROHS", LCSC Part Number=C474930
L1: library part TC5026B, "Toroidal Power Inductor 47uH 6A / Outer Diameter 15mm Width 8mm"
MH1 MH2 MH3 MH4: library part MH_5MMX2P2MM_M2, "5mm x 2.2mm Mounting Hole"
Q1 Q2: library part SS8050-G, "125mW Thin Film Resistor 150V ±50ppm/℃ ±1% 2kΩ 0805 Chip Resistor - Surface Mount ROHS", Case Code (Imperial)=0805, LCSC Part Number=C3199946, Manufacturer=Comchip, Max Operating Temperature=155°C, Max Power Dissipation=125mW, Min Operating Temperature=-55°C, Supplier Part Number=641-1790-1-ND, Temperature Coefficient=50ppm/°C, Tolerance=1%, Voltage Rating=150V, Case/Package=0805, Category=Transistors, China RoHS=Non-Compliant, ComponentLink1Description=https://datasheet.ciiva.com:443/pdfs/VipMasterIC/IC/COMC/COMC-S-A0004994192/COMC-S-A0004994192-1.pdf?src-supplier=IHS+Markit, ComponentLink1URL=https://datasheet.ciiva.com:443/pdfs/VipMasterIC/IC/COMC/COMC-S-A0004994192/COMC-S-A0004994192-1.pdf?src-supplier=IHS+Markit, ComponentLink2Description="http://www.comchiptech.com/admin/files/product/SS8050-G RevA181526.pdf?src-supplier=Digikey", ComponentLink2URL="http://www.comchiptech.com/admin/files/product/SS8050-G RevA181526.pdf?src-supplier=Digikey", ComponentLink3Description=https://datasheet.octopart.com:443/RT0805FRE072KL-Yageo-datasheet-176402239.pdf?src-supplier=Future+Electronics, ComponentLink3URL=https://datasheet.octopart.com:443/RT0805FRE072KL-Yageo-datasheet-176402239.pdf?src-supplier=Future+Electronics, ComponentLink4Description=https://datasheet.octopart.com:443/RT0805FRE072KL-Yageo-datasheet-169971040.pdf?src-supplier=Future+Electronics, ComponentLink4URL=https://datasheet.octopart.com:443/RT0805FRE072KL-Yageo-datasheet-169971040.pdf?src-supplier=Future+Electronics, ComponentLink5Description=https://datasheet.octopart.com:443/RT0805FRE072KL-Yageo-datasheet-166250672.pdf?src-supplier=Future+Electronics, ComponentLink5URL=https://datasheet.octopart.com:443/RT0805FRE072KL-Yageo-datasheet-166250672.pdf?src-supplier=Future+Electronics, ComponentLink6Description=https://datasheet.octopart.com:443/RT0805FRE072KL-Yageo-datasheet-137700930.pdf?src-supplier=Future+Electronics, ComponentLink6URL=https://datasheet.octopart.com:443/RT0805FRE072KL-Yageo-datasheet-137700930.pdf?src-supplier=Future+Electronics, ComponentLink7Description=https://datasheet.octopart.com/RT0805FRE072KL-Yageo-datasheet-86813807.pdf, ComponentLink7URL=https://datasheet.octopart.com/RT0805FRE072KL-Yageo-datasheet-86813807.pdf, ComponentLink8Description=http://sigma.octopart.com:80/conflict_mineral_statement/Yageo-company-3.pdf?src-supplier=Compliance+Statements, ComponentLink8URL=http://sigma.octopart.com:80/conflict_mineral_statement/Yageo-company-3.pdf?src-supplier=Compliance+Statements, ComponentLink9Description=http://sigma.octopart.com:80/rohs_statement/Yageo-company-2.pdf?src-supplier=Compliance+Statements, ComponentLink9URL=http://sigma.octopart.com:80/rohs_statement/Yageo-company-2.pdf?src-supplier=Compliance+Statements, Composition="Thin Film", Contact Plating="Lead, Tin", Depth=1.25mm, Features="Moisture Resistant", Height=500µm, Lead Free="Lead Free", Length=2mm, Lifecycle Status=Production, Manufacturer Part Number=SS8050-G, Military Standard=Not, Mounting Technology="Surface Mount", Number of Terminals=2, Number of Terminations=2, Power Dissipation=125mW, Power Rating=125mW, Pricing="1=0.17, 10=0.113, 100=0.0755, 500=0.05756, 1000=0.05148 (USD)", Radiation Hardening=No, REACH SVHC=Yes, Reach SVHC Compliant=Yes, RoHS=Yes, RoHS Compliant=Yes, Schedule B="8533210045, 8533210045|8533210045|8533210045|8533210045|8533210045", Stock=93287, Supplier=Digikey, Termination=SMD/SMT, Voltage Rating (DC)=150V, Weight=5.499807mg, Width=1.25mm, Working Voltage=150V
Q3: library part IRLML6402TRPBF, "MOSFET P-CH 20V 3.7A SOT23", Case/Package=SOT-23, Continuous Drain Current (ID)=3.7A, Current Rating=-3.7A, Drain to Source Breakdown Voltage=-20V, Drain to Source Resistance=65mΩ, Gate to Source Voltage (Vgs)=12V, Input Capacitance=633pF, Manufacturer=Infineon, Manufacturer Package Identifier=Micro3, Max Junction Temperature (Tj)=150°C, Max Power Dissipation=1.3W, Min Breakdown Voltage=20V, Min Operating Temperature=-55°C, Package Quantity=3000, Threshold Voltage=-550mV, Category=MOSFETs, ComponentLink1Description=https://datasheet.octopart.com:443/IRLML6402TRPBF-Infineon-datasheet-180073373.pdf?src-supplier=Newark, ComponentLink1URL=https://datasheet.octopart.com:443/IRLML6402TRPBF-Infineon-datasheet-180073373.pdf?src-supplier=Newark, ComponentLink2Description=https://datasheet.octopart.com:443/IRLML6402TRPBF-Infineon-datasheet-34171439.pdf?src-supplier=IHS, ComponentLink2URL=https://datasheet.octopart.com:443/IRLML6402TRPBF-Infineon-datasheet-34171439.pdf?src-supplier=IHS, ComponentLink3Description=https://datasheet.octopart.com:443/IRLML6402TRPBF-Infineon-datasheet-10897830.pdf?src-supplier=IHS, ComponentLink3URL=https://datasheet.octopart.com:443/IRLML6402TRPBF-Infineon-datasheet-10897830.pdf?src-supplier=IHS, ComponentLink4Description=https://sigma.octopart.com:443/138896058/technical_drawing/Infineon-IRLML6402TRPBF.pdf?src-supplier=Upverter, ComponentLink4URL=https://sigma.octopart.com:443/138896058/technical_drawing/Infineon-IRLML6402TRPBF.pdf?src-supplier=Upverter, ComponentLink5Description=https://datasheet.octopart.com:443/IRLML6402TRPBF-Infineon-datasheet-93882.pdf?src-supplier=element14+APAC, ComponentLink5URL=https://datasheet.octopart.com:443/IRLML6402TRPBF-Infineon-datasheet-93882.pdf?src-supplier=element14+APAC, ComponentLink6Description=https://datasheet.octopart.com:443/IRLML6402TRPBF-Infineon-datasheet-10898224.pdf?src-supplier=element14+APAC, ComponentLink6URL=https://datasheet.octopart.com:443/IRLML6402TRPBF-Infineon-datasheet-10898224.pdf?src-supplier=element14+APAC, ComponentLink7Description=https://datasheet.octopart.com:443/IRLML6402TRPBF-Infineon-datasheet-59237.pdf?src-supplier=element14+APAC, ComponentLink7URL=https://datasheet.octopart.com:443/IRLML6402TRPBF-Infineon-datasheet-59237.pdf?src-supplier=element14+APAC, ComponentLink8Description=https://datasheet.octopart.com:443/IRLML6402TRPBF-International-Rectifier-datasheet-14060680.pdf?src-supplier=iiiC, ComponentLink8URL=https://datasheet.octopart.com:443/IRLML6402TRPBF-International-Rectifier-datasheet-14060680.pdf?src-supplier=iiiC, ComponentLink9Description=https://datasheet.octopart.com:443/IRLML6402-International-Rectifier-datasheet-10848916.pdf?src-supplier=iiiC, ComponentLink9URL=https://datasheet.octopart.com:443/IRLML6402-International-Rectifier-datasheet-10848916.pdf?src-supplier=iiiC, ComponentLink10Description=https://datasheet.octopart.com:443/IRLML6402TRPBF-International-Rectifier-datasheet-17576723.pdf?src-supplier=TME, ComponentLink10URL=https://datasheet.octopart.com:443/IRLML6402TRPBF-International-Rectifier-datasheet-17576723.pdf?src-supplier=TME, ComponentLink11Description=https://datasheet.octopart.com:443/IRLML6402TRPBF-Infineon-datasheet-9963940.pdf?src-supplier=RS+(Formerly+Allied+Electronics), ComponentLink11URL=https://datasheet.octopart.com:443/IRLML6402TRPBF-Infineon-datasheet-9963940.pdf?src-supplier=RS+(Formerly+Allied+Electronics), ComponentLink12Description=https://datasheet.octopart.com:443/IRLML6402TRPBF-International-Rectifier-datasheet-7268483.pdf?src-supplier=Jameco, ComponentLink12URL=https://datasheet.octopart.com:443/IRLML6402TRPBF-International-Rectifier-datasheet-7268483.pdf?src-supplier=Jameco, ComponentLink13Description=https://datasheet.octopart.com:443/IRLML6402TRPBF-International-Rectifier-datasheet-63679.pdf?src-supplier=Farnell, ComponentLink13URL=https://datasheet.octopart.com:443/IRLML6402TRPBF-International-Rectifier-datasheet-63679.pdf?src-supplier=Farnell, ComponentLink14Description=http://sigma.octopart.com:80/conflict_mineral_statement/Infineon-company-51.pdf?src-supplier=Compliance+Statements, ComponentLink14URL=http://sigma.octopart.com:80/conflict_mineral_statement/Infineon-company-51.pdf?src-supplier=Compliance+Statements, ComponentLink15Description=http://sigma.octopart.com:80/reach_statement/International-Rectifier-company-55.pdf?src-supplier=Compliance+Statements, ComponentLink15URL=http://sigma.octopart.com:80/reach_statement/International-Rectifier-company-55.pdf?src-supplier=Compliance+Statements, ComponentLink16Description=http://sigma.octopart.com:80/rohs_statement/International-Rectifier-company-54.pdf?src-supplier=Compliance+Statements, ComponentLink16URL=http://sigma.octopart.com:80/rohs_statement/International-Rectifier-company-54.pdf?src-supplier=Compliance+Statements, Contact Plating=Tin, Drain to Source Voltage (Vdss)=-20V, Dual Supply Voltage=-20V, Element Configuration=Single, Fall Time=381ns, Height=1.12mm, Lead Free="Lead Free", Length=3.0226mm, Lifecycle Status=NRND, Manufacturer Part Number=IRLML6402TRPBF, Max Operating Temperature=150°C, Mounting Technology="Surface Mount", Nominal Vgs=-550mV, Number of Channels=1, Number of Elements=1, Number of Terminals=3, On-State Resistance=65mΩ, Packaging="Tape & Reel", Pins=3, Power Dissipation=1.3W, Pricing="3000=0.0888, 6000=0.084, 9000=0.069, 24000=0.061 (USD)", Radiation Hardening=No, Rds On Max=65mΩ, REACH SVHC=Yes, Rise Time=48ns, RoHS=Compliant, Schedule B="8541290080, 8541290080|8541290080|8541290080|8541290080|8541290080", Stock=1104000, Supplier="Arrow Electronics", Supplier Part Number=IRLML6402TRPBF, Termination=SMD/SMT, Turn-Off Delay Time=588ns, Turn-On Delay Time=350ns, Voltage Rating (DC)=-20V
Q4: library part LN2302LT1G, "20V 2.3A 60mΩ@4.5V,2.8A 900mW 1.2V@250uA 1 N-Channel SOT-23 MOSFETs", LCSC Number Part=C77962, Datasheet=https://www.lcsc.com/datasheet/lcsc_datasheet_1811031615_LRC-LN2302LT1G_C77962.pdf
R1: library part RT0805FRE072KL, "2K OHM 1% 1/8W 0805", LCSC Part Number=C17604
R2: library part RC0805FR-0710K5L, "10.5K OHM 1% 1/8W 0805", Case Code (Imperial)=0805, LCSC Part Number=C2093736, Manufacturer="Yageo Group", Max Operating Temperature=155°C, Min Operating Temperature=-55°C, Power Dissipation=125mW, Supplier Part Number=311-10.5KCRCT-ND, Temperature Coefficient=100ppm/°C, Tolerance=1%, Voltage Rating=150V, Case/Package=0805, Category="Chip SMD Resistors", China RoHS=Non-Compliant, ComponentLink1Description=https://datasheet.octopart.com:443/RC0805FR-0710K5L-Yageo-datasheet-175887523.pdf?src-supplier=IHS, ComponentLink1URL=https://datasheet.octopart.com:443/RC0805FR-0710K5L-Yageo-datasheet-175887523.pdf?src-supplier=IHS, ComponentLink2Description=https://datasheet.octopart.com:443/RC0805FR-0710K5L-Yageo-datasheet-103092701.pdf?src-supplier=Upverter, ComponentLink2URL=https://datasheet.octopart.com:443/RC0805FR-0710K5L-Yageo-datasheet-103092701.pdf?src-supplier=Upverter, ComponentLink3Description=https://datasheet.octopart.com:443/RC0805FR-0710K5L-Yageo-datasheet-8330313.pdf?src-supplier=Future+Electronics, ComponentLink3URL=https://datasheet.octopart.com:443/RC0805FR-0710K5L-Yageo-datasheet-8330313.pdf?src-supplier=Future+Electronics, ComponentLink4Description=https://datasheet.octopart.com:443/RC0805FR-0710K5L-Yageo-Group-datasheet-176638170.pdf?src-supplier=Future+Electronics, ComponentLink4URL=https://datasheet.octopart.com:443/RC0805FR-0710K5L-Yageo-Group-datasheet-176638170.pdf?src-supplier=Future+Electronics, ComponentLink5Description=https://datasheet.octopart.com:443/RC0805FR-0710K5L-Yageo-datasheet-164759695.pdf?src-supplier=Future+Electronics, ComponentLink5URL=https://datasheet.octopart.com:443/RC0805FR-0710K5L-Yageo-datasheet-164759695.pdf?src-supplier=Future+Electronics, ComponentLink6Description=https://datasheet.octopart.com:443/RC0805FR-0710K5L-Yageo-datasheet-12592811.pdf?src-supplier=Future+Electronics, ComponentLink6URL=https://datasheet.octopart.com:443/RC0805FR-0710K5L-Yageo-datasheet-12592811.pdf?src-supplier=Future+Electronics, ComponentLink7Description=https://datasheet.octopart.com:443/RC0805FR-0710K5L-Yageo-datasheet-8324252.pdf?src-supplier=Future+Electronics, ComponentLink7URL=https://datasheet.octopart.com:443/RC0805FR-0710K5L-Yageo-datasheet-8324252.pdf?src-supplier=Future+Electronics, ComponentLink8Description=https://datasheet.octopart.com:443/RC0805FR-0710K5L-Yageo-datasheet-141265859.pdf?src-supplier=TME, ComponentLink8URL=https://datasheet.octopart.com:443/RC0805FR-0710K5L-Yageo-datasheet-141265859.pdf?src-supplier=TME, ComponentLink9Description=https://datasheet.octopart.com/RC0805FR-0710K5L-Yageo-datasheet-73766026.pdf, ComponentLink9URL=https://datasheet.octopart.com/RC0805FR-0710K5L-Yageo-datasheet-73766026.pdf, ComponentLink10Description=https://datasheet.octopart.com:443/RC0805FR-0710K5L-Yageo-datasheet-118657.pdf?src-supplier=DigiKey, ComponentLink10URL=https://datasheet.octopart.com:443/RC0805FR-0710K5L-Yageo-datasheet-118657.pdf?src-supplier=DigiKey, ComponentLink11Description=http://sigma.octopart.com:80/conflict_mineral_statement/Yageo-company-3.pdf?src-supplier=Compliance+Statements, ComponentLink11URL=http://sigma.octopart.com:80/conflict_mineral_statement/Yageo-company-3.pdf?src-supplier=Compliance+Statements, ComponentLink12Description=http://sigma.octopart.com:80/rohs_statement/Yageo-company-2.pdf?src-supplier=Compliance+Statements, ComponentLink12URL=http://sigma.octopart.com:80/rohs_statement/Yageo-company-2.pdf?src-supplier=Compliance+Statements, Composition="Thick Film", Contact Plating="Lead, Tin", Depth=1.25mm, Height=500µm, Lead Free="Lead Free", Length=2mm, Lifecycle Status=Production, Manufacturer Part Number=RC0805FR-0710K5L, Military Standard=Not, Mounting Technology="Surface Mount", Number of Terminals=2, Packaging="Tape & Reel", Power Rating=125mW, Pricing="1=0.1, 10=0.014, 25=0.0112, 50=0.0092, 1000=0.00714 (USD)", Radiation Hardening=No, REACH SVHC=Yes, RoHS=Compliant, Schedule B="8533210045, 8533210045|8533210045, 8533210045|8533210045|8533210045, 8533210045|8533210045|8533210045|8533210045", Stock=14665, Supplier=DigiKey, Termination=SMD/SMT, Width=1.25mm, Working Voltage=150V
R3 R5 R8: library part RC0805JR-0710KL, "10K OHM 5% 1/8W 0805", Case/Package=0805, LCSC Part Number=C100047, Manufacturer=Yageo, Max Operating Temperature=155°C, Min Operating Temperature=-55°C, Package Height=0.5mm, Package Length=2mm, Package Shape=Rectangular, Package Style=SMTMeter, Package Width=1.25mm, Power=125mW, Rated Temperature=70°C, Resistor Type="FIXED RESISTOR", Supplier Part Number=311-10KARCT-ND, Temperature Coefficient=100ppm/°C, Tolerance=5%, Working Voltage=150V, Additional Feature="LASER TRIMMABLE", Category="Chip SMD Resistors", ComponentLink1Description=https://datasheet.ciiva.com:443/pdfs/VipMasterIC/IC/YAGO/YAGO-S-A0008145938/YAGO-S-A0008145938-1.pdf?src-supplier=IHS+Markit, ComponentLink1URL=https://datasheet.ciiva.com:443/pdfs/VipMasterIC/IC/YAGO/YAGO-S-A0008145938/YAGO-S-A0008145938-1.pdf?src-supplier=IHS+Markit, ComponentLink2Description=https://datasheet.ciiva.com/7983/444164-7983765.pdf?src-supplier=Element14, ComponentLink2URL=https://datasheet.ciiva.com/7983/444164-7983765.pdf?src-supplier=Element14, ComponentLink3Description=https://datasheet.ciiva.com/7941/444164-7941870.pdf?src-supplier=Element14, ComponentLink3URL=https://datasheet.ciiva.com/7941/444164-7941870.pdf?src-supplier=Element14, ComponentLink4Description=https://datasheet.ciiva.com/7941/444164-7941871.pdf?src-supplier=Element14, ComponentLink4URL=https://datasheet.ciiva.com/7941/444164-7941871.pdf?src-supplier=Element14, Construction=Chip, JESD-609 Code=e3, Manufacturer Part Number=RC0805JR-0710KL, Mounting Technology="Surface Mount", Packaging="Tape and Reel", Pins=2, Pricing="1=0.1, 10=0.015, 50=0.0122, 100=0.0092, 500=0.00764, 1000=0.00612, 5000=0.00306, 10000=0.00291, 15000=0.00274 (USD)", Reach SVHC Compliant=Yes, RoHS=Yes, RoHS Compliant=Yes, Stock=306810, Supplier=Digikey, Technology="METAL GLAZE/THICK FILM", Terminal Finish=Nickel, Termination=Wraparound
R4 R11: library part RC0805FR-071KL, "1 kOhms ±1% 0.125W, 1/8W Chip Resistor 0805 (2012 Metric) Moisture Resistant Thick Film", Case/Package=0805, LCSC Part Number=C95781, Manufacturer=Yageo, Max Operating Temperature=155°C, Min Operating Temperature=-55°C, Package Height=0.5mm, Package Length=2mm, Package Shape=Rectangular, Package Style=SMTMeter, Package Width=1.25mm, Power=125mW, Rated Temperature=70°C, Resistor Type="FIXED RESISTOR", Supplier Part Number=311-1.00KCRCT-ND, Temperature Coefficient=100ppm/°C, Tolerance=1%, Working Voltage=150V, Additional Feature="LASER TRIMMABLE", Category="Chip SMD Resistors", ComponentLink1Description=https://datasheet.ciiva.com:443/pdfs/VipMasterIC/IC/YAGO/YAGO-S-A0008145938/YAGO-S-A0008145938-1.pdf?src-supplier=IHS+Markit, ComponentLink1URL=https://datasheet.ciiva.com:443/pdfs/VipMasterIC/IC/YAGO/YAGO-S-A0008145938/YAGO-S-A0008145938-1.pdf?src-supplier=IHS+Markit, Construction=Chip, JESD-609 Code=e3, Manufacturer Part Number=RC0805FR-071KL, Mounting Technology="Surface Mount", Packaging="Tape and Reel", Pins=2, Pricing="1=0.1, 10=0.016, 50=0.0132, 500=0.00868, 1000=0.00714, 5000=0.00408, 10000=0.00306 (USD)", Reach SVHC Compliant=Yes, RoHS=Yes, RoHS Compliant=Yes, Stock=1656654, Supplier=Digikey, Technology="METAL GLAZE/THICK FILM", Terminal Finish=Nickel, Termination=Wraparound